# Altium PCB PCB_GEMAS1.1.PcbDoc
Units mm, origin at the board's own origin, x right, y up, seen from the top; angles counter-clockwise.
Board outline 100 x 72 mm, 2 copper layers (Top Layer, Bottom Layer); 89 components, 61 nets, 762 pads, 0 vias.
Unrouted connection lines stored in the file: 223.
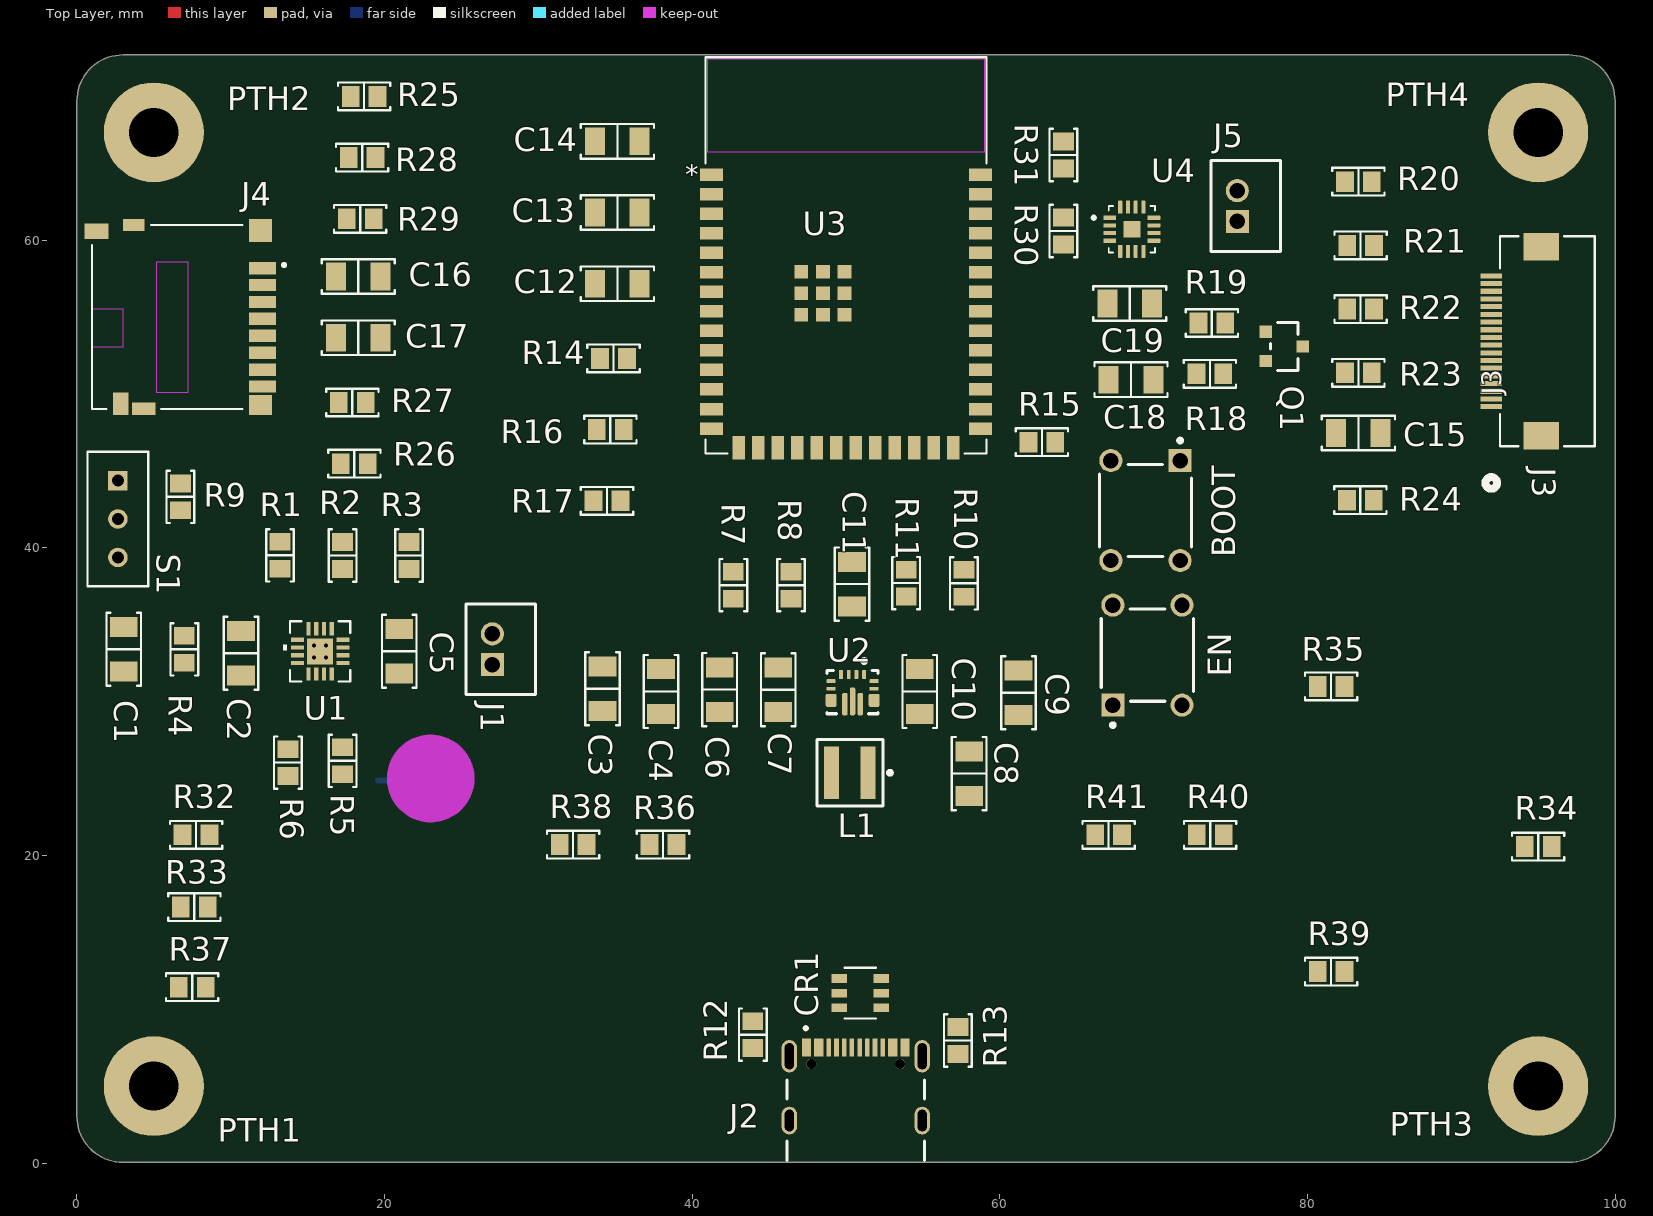
[diagram p0: Top Layer view]
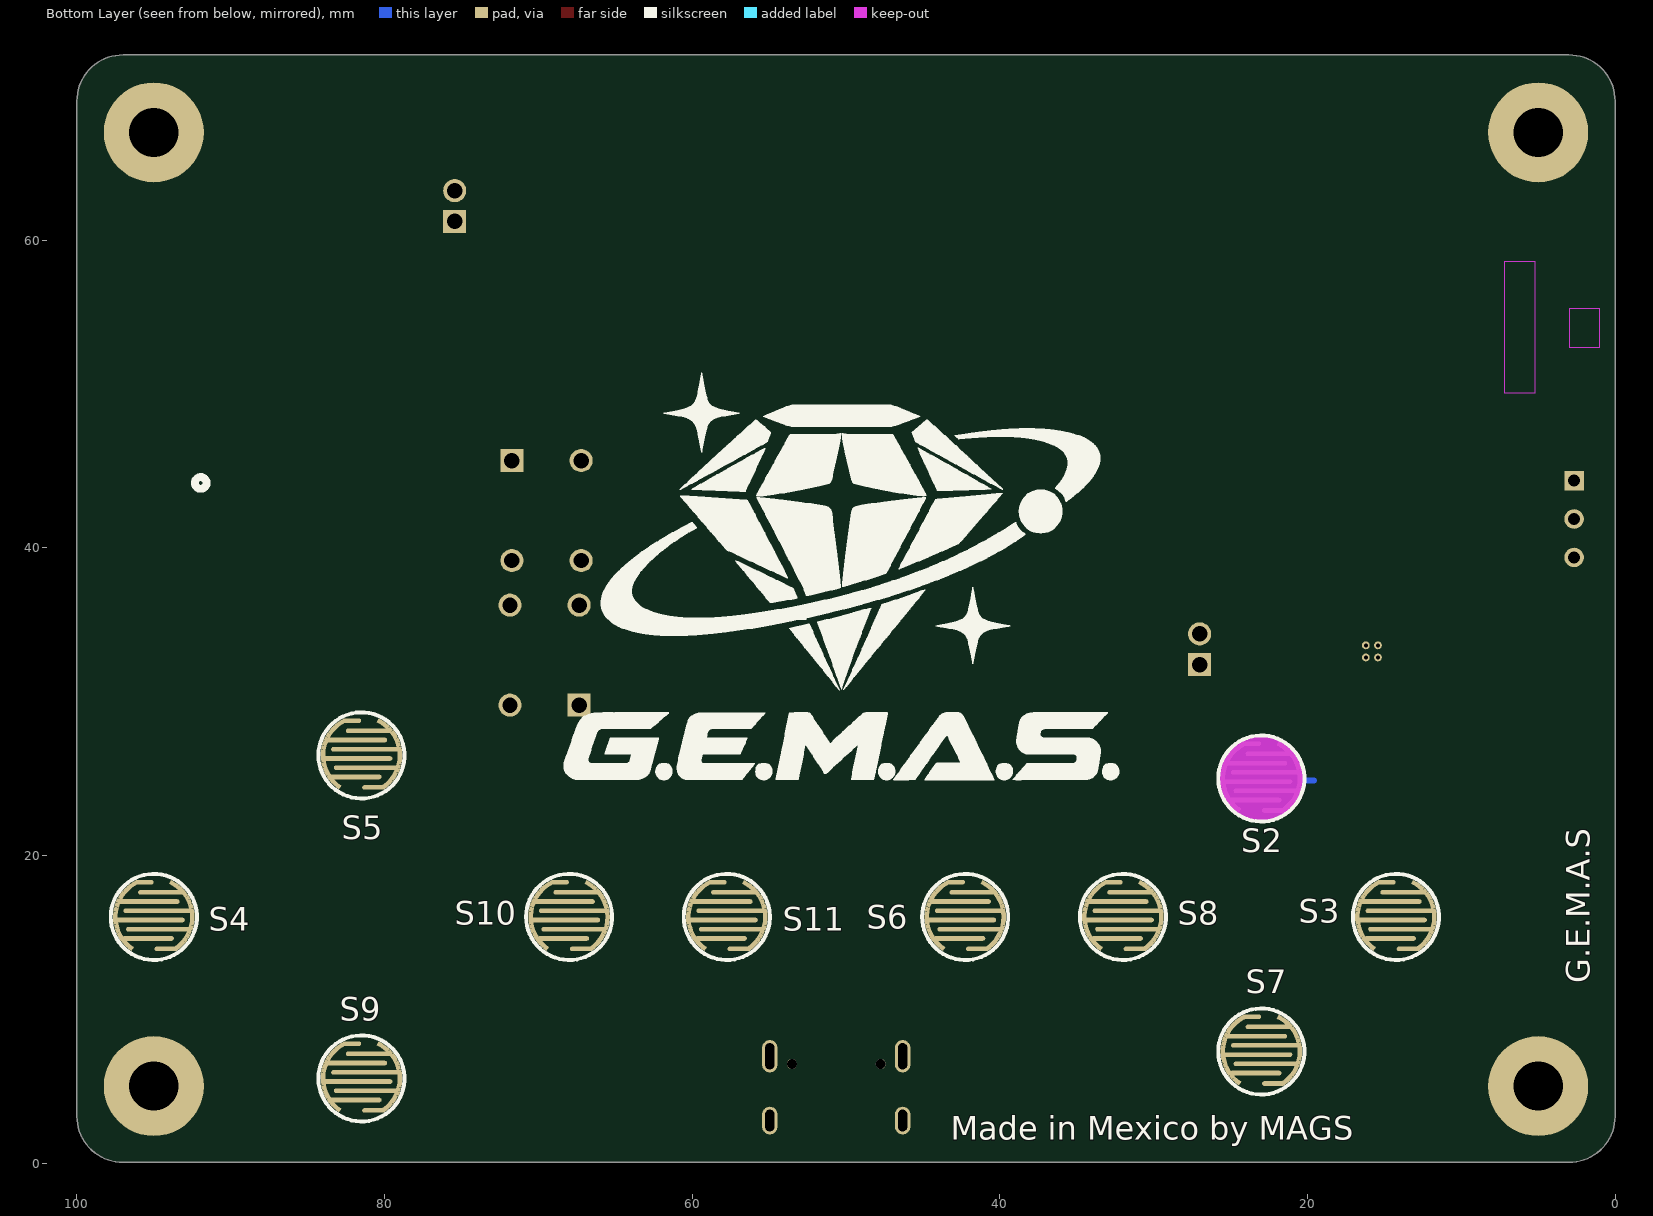
[diagram p1: Bottom Layer view, seen from below]

## Layer stack, top to bottom
Top Solder: solder mask 0.0102, Solder Resist, Dk 3.5
Top Layer: signal copper 0.0356
Dielectric 1: dielectric 0.32, FR-4, Dk 4.8
Bottom Layer: signal copper 0.0356
Bottom Solder: solder mask 0.0102, Solder Resist, Dk 3.5

## Board outline
0,3.041 0,69.041 cw(c3,69.041) 3,72.041 97,72.041 cw(c97,69.041) 100,69.041 100,3.041 cw(c97,3.041) 97,0.041 3,0.041 cw(c3,3.041)

## Design rules (kind name [scope] priority, off if disabled: settings)
Clearance [All] p1: gap=0.4 ignorepadtopadclearanceinfootprint=FALSE
MinimumSolderMaskSliver [All] p1: minsoldermaskwidth=0.1
PolygonConnect [All] p1: connectstyle=Relief reliefconductorwidth=0.254 reliefentries=4 polygonreliefangle="90 Angle" airgapwidth=0.254
RoutingVias [All] p1: holewidth=0.3 width=0.6 viastyle="Through Hole" minholewidth=0.3 minwidth=0.6 maxholewidth=0.3 maxwidth=0.6
SilkToSolderMaskClearance [IsPad] p1: minsilkscreentomaskgap=0.15 clearancetoexposedcopper=TRUE
SolderMaskExpansion [All] p1: expansion=0.05 istentingtop=FALSE
SupplyNets "Schematic Supply Nets_4" [InNet('+3V3')] p1: voltage=0.000
SupplyNets "Schematic Supply Nets_3" [InNet('GND')] p2: voltage=0.000
SupplyNets "Schematic Supply Nets_2" [InNet('VBAT')] p3: voltage=0.000
SupplyNets "Schematic Supply Nets_1" [InNet('VSYS')] p4: voltage=0.000
SupplyNets "Schematic Supply Nets" [InNet('VBUS_V5')] p5: voltage=0.000
Width W_BACKLIGHT [InNetClass('BACKLIGHT')] p1: maxlimit=0.5 minlimit=0.4 preferedwidth=0.5
Width W_SPEAKER [InNetClass('SPEAKER')] p2: maxlimit=0.8 minlimit=0.4 preferedwidth=0.5
Width W_POWER [InNetClass('POWER') Or InNetClass('REG_SW')] p3: maxlimit=1.5 minlimit=0.4 preferedwidth=0.8
Width [All] p4: maxlimit=1.5 minlimit=0.4 preferedwidth=0.5
28 further rules are at their usual default settings.

## Classes and differential pairs
net class GROUND: GND
net class CONTROL: NetR2_2 NetR3_2 NetR9_2 USB_POWER_GOOD_N
net class BUTTONS: NetR32_1 NetR33_1 NetR34_1 NetR35_1 NetR36_1 NetR37_1 NetR38_1 NetR39_1 NetR40_1 NetR41_1
net class AUDIO: NetR30_1 NetR30_2 NetU3_31 NetU3_32 NetU3_33
net class SPI_DISPLAY: NetJ3_2 NetJ3_4 NetJ3_5 NetJ4_2 NetR19_1 SPI_MISO SPI_MOSI SPI_SCK
net class USB: NetCR1_1 NetCR1_3 NetCR1_4 NetCR1_6 NetR16_1 NetR17_1
net class POWER: +3V3 VBAT VBUS_V5 VSYS
component class USB-C: CR1 J2 R12 R13
component class Pantalla_microSD: C15 C16 C17 J3 J4 Q1 R18 R19 R20 R21 R22 R23 R24 R25 R26 R27 R28 R29
component class ESP32: BOOT C12 C13 C14 EN R14 R15 R16 R17 U3
component class Controles: PTH1 PTH2 PTH3 PTH4 R32 R33 R34 R35 R36 R37 R38 R39 R40 R41 S2 S3 S4 S5 S6 S7 S8 S9 S10 S11
component class Audio: C18 C19 J5 R30 R31 U4
component class Alimentacion: C1 C2 C3 C4 C5 C6 C7 C8 C9 C10 C11 J1 L1 R1 R2 R3 R4 R5 R6 R7 R8 R9 R10 R11 S1 U1 U2

## Components (designator, comment, footprint, x,y, rotation, side; value= is the part's Value field where it differs from the comment)
BOOT "B3F-1000" OMRON-B3F-1000-4_V 69.469,42.418 r270 top (schematic designator SW1)
C1 "Capacitor" "CAP 1206_3216" 3.048,33.401 r90 top value=1uF
C2 "Capacitor" "CAP 1206_3216" 10.668,33.147 r270 top value=10uF
C3 "22uF" "CAP 1206_3216" 34.168,30.832 r90 top
C4 "22uF" "CAP 1206_3216" 37.977,30.652 r90 top
C5 "Capacitor" "CAP 1206_3216" 20.955,33.274 r270 top value=10uF
C6 "22uF" "CAP 1206_3216" 41.786,30.779 r90 top
C7 "Capacitor" "CAP 1206_3216" 45.595,30.762 r90 top value=10uF
C8 "Capacitor" "CAP 1206_3216" 58.007,25.318 r90 top value=10uF
C9 "Capacitor" "CAP 1206_3216" 61.219,30.578 r270 top value=10uF
C10 "Capacitor" "CAP 1206_3216" 54.794,30.652 r270 top value=10uF
C11 "Capacitor" "CAP 1206_3216" 50.395,37.638 r270 top value=100nF
C12 "1 uF" "CAP 1206_3216" 35.141,57.164 r0 top
C13 "Capacitor" "CAP 1206_3216" 35.141,61.792 r0 top value=22uF
C14 "Capacitor" "CAP 1206_3216" 35.141,66.421 r180 top value=100nF
C15 "Capacitor" "CAP 1206_3216" 83.312,47.459 r0 top value=100nF
C16 "Capacitor" "CAP 1206_3216" 18.288,57.629 r180 top value=100nF
C17 "Capacitor" "CAP 1206_3216" 18.288,53.65 r180 top value=10uF
C18 "Capacitor" "CAP 1206_3216" 68.527,50.927 r0 top value=10uF
C19 "Capacitor" "CAP 1206_3216" 68.453,55.88 r0 top value=100nF
CR1 "USBLC6-2SC6" SOT23-6L_STM 50.927,11.049 r180 top
EN "B3F-1000" OMRON-B3F-1000-4_V 69.596,33.02 r90 top (schematic designator SW2)
J1 "B2B-PH-K-S(LF)(SN)" JST-B2B-PH-K-S_V 27.559,33.401 r90 top
J2 "USB4105-GF-A" GCT_USB4105-GF-A 50.635,2.762 r0 top
J3 "FH12-18S-0.5SH(55)" CONN_FH12-18S-0.5SH-55_HIR 91.948,49.173 r90 top
J4 "DM3D-SF" HRS_DM3D-SF 12.07,54.979 r90 top
J5 "B2B-PH-K-S(LF)(SN)" JST-B2B-PH-K-S_V 75.988,62.214 r90 top
L1 "1.5uH" FP-XFL4020-MFG 50.255,25.371 r180 top
PTH1 "MH_M3" PCBComponent_1#1 -53.217,211.535 r0 top
PTH2 "MH_M3" PCBComponent_1#2 54.61,212.344 r0 top
PTH3 "MH_M3" PCBComponent_1#3 46.736,212.344 r0 top
PTH4 "MH_M3" PCBComponent_1#4 28.571,279.48 r0 top
Q1 "AO3400A" FP-SOT23-MFG 78.486,53.086 r0 top
R1 "Resistor" "RES 0805_2012" 13.208,39.511 r270 top value="10 k"
R2 "Resistor" "RES 0805_2012" 17.272,39.497 r270 top value="10 k"
R3 "Resistor" "RES 0805_2012" 21.59,39.497 r270 top value="10 k"
R4 "Resistor" "RES 0805_2012" 6.985,33.401 r90 top value="3.48 k"
R5 "Resistor" "RES 0805_2012" 17.272,26.148 r270 top value="10 k"
R6 "Resistor" "RES 0805_2012" 13.716,26.035 r270 top value="1.78 k"
R7 "Resistor" "RES 0805_2012" 42.677,37.563 r270 top value="470 k"
R8 "Resistor" "RES 0805_2012" 46.423,37.563 r90 top value="150 k"
R9 "Resistor" "RES 0805_2012" 6.731,43.307 r90 top value=10k
R10 "Resistor" "RES 0805_2012" 57.663,37.69 r270 top value=10k
R11 "Resistor" "RES 0805_2012" 53.917,37.704 r270 top value=10k
R12 "Resistor" "RES 0805_2012" 43.942,8.349 r90 top value="5.1 k"
R13 "Resistor" "RES 0805_2012" 57.277,7.968 r270 top value="5.1 k"
R14 "10 k" "RES 0805_2012" 34.887,52.31 r0 top value="10 K"
R15 "10 k" "RES 0805_2012" 62.738,46.863 r0 top value="10 K"
R16 "Resistor" "RES 0805_2012" 34.677,47.682 r180 top value=22
R17 "Resistor" "RES 0805_2012" 34.466,43.053 r180 top value=22
R18 "Resistor" "RES 0805_2012" 73.66,51.308 r0 top value="100 k"
R19 "Resistor" "RES 0805_2012" 73.787,54.61 r0 top value=100
R20 "Resistor" "RES 0805_2012" 83.312,63.795 r180 top value="1 k"
R21 "Resistor" "RES 0805_2012" 83.453,59.655 r180 top value="1 k"
R22 "Resistor" "RES 0805_2012" 83.453,55.514 r180 top value="1 k"
R23 "Resistor" "RES 0805_2012" 83.312,51.374 r180 top value="1 k"
R24 "Resistor" "RES 0805_2012" 83.439,43.094 r180 top value="10 k"
R25 "Resistor" "RES 0805_2012" 18.669,69.342 r180 top value="10 k"
R26 "Resistor" "RES 0805_2012" 18.034,45.466 r180 top value="10 k"
R27 "Resistor" "RES 0805_2012" 17.907,49.445 r0 top value="10 k"
R28 "Resistor" "RES 0805_2012" 18.542,65.363 r180 top value="10 k"
R29 "Resistor" "RES 0805_2012" 18.415,61.383 r0 top value="10 k"
R30 "Resistor" "RES 0805_2012" 64.135,60.593 r90 top value="634 K"
R31 "Resistor" "RES 0805_2012" 64.135,65.532 r90 top value=10k
R32 "Resistor" "RES 0805_2012" 7.747,21.336 r180 top value="10 k"
R33 "Resistor" "RES 0805_2012" 7.634,16.637 r180 top value="10 k"
R34 "Resistor" "RES 0805_2012" 94.996,20.574 r0 top value="10 k"
R35 "Resistor" "RES 0805_2012" 81.534,30.988 r0 top value="10 k"
R36 "Resistor" "RES 0805_2012" 38.1,20.701 r180 top value="10 k"
R37 "Resistor" "RES 0805_2012" 7.493,11.43 r180 top value="10 k"
R38 "Resistor" "RES 0805_2012" 32.258,20.701 r0 top value="10 k"
R39 "Resistor" "RES 0805_2012" 81.534,12.446 r180 top value="10 k"
R40 "Resistor" "RES 0805_2012" 73.674,21.336 r0 top value="10 k"
R41 "Resistor" "RES 0805_2012" 67.07,21.336 r180 top value="10 k"
S1 "Single-Pole, Double-Throw Switch" 1P2T_SS-12D00_CNK 2.667,44.37 r0 top
S2 "Single-Pole, Single-Throw Switch" SNES_BTN_soft+mech_5mm_0.3_0.3 23,25 r180 bottom
S3 "Single-Pole, Single-Throw Switch" SNES_BTN_soft+mech_5mm_0.3_0.3 14.25,16 r180 bottom
S4 "Single-Pole, Single-Throw Switch" SNES_BTN_soft+mech_5mm_0.3_0.3 95,16 r180 bottom
S5 "Single-Pole, Single-Throw Switch" SNES_BTN_soft+mech_5mm_0.3_0.3 81.5,26.5 r180 bottom
S6 "Single-Pole, Single-Throw Switch" SNES_BTN_soft+mech_5mm_0.3_0.3 42.25,16 r180 bottom
S7 "Single-Pole, Single-Throw Switch" SNES_BTN_soft+mech_5mm_0.3_0.3 23,7.25 r180 bottom
S8 "Single-Pole, Single-Throw Switch" SNES_BTN_soft+mech_5mm_0.3_0.3 32,16 r180 bottom
S9 "Single-Pole, Single-Throw Switch" SNES_BTN_soft+mech_5mm_0.3_0.3 81.5,5.5 r180 bottom
S10 "Single-Pole, Single-Throw Switch" SNES_BTN_soft+mech_5mm_0.3_0.3 68,16 r180 bottom
S11 "Single-Pole, Single-Throw Switch" SNES_BTN_soft+mech_5mm_0.3_0.3 57.75,16 r180 bottom
U1 "BQ24074RGTR" RGT16_1P7X1P7 15.812,33.261 r180 top
U2 "TPS63070RNMR" FP-RNM0015A-MFG 50.427,30.607 r270 top
U3 "ESP32-S3-WROOM-1-N16R8" ESP32-S3-WROOM-1_EXP 50,59 r0 top
U4 "MAX98357AETE+T" QFN50P300X300X80-17N 68.58,60.706 r0 top

## Footprints (in the part's own frame and the unit in brackets; to place one, negate y for a bottom-side part, rotate by r counter-clockwise, add the part's x,y. Pads: shape width x height; smd on the part's side, far side on the other; paste and mask are expansions set on the pad)
1P2T_SS-12D00_CNK [mil]
  rect 50x50 hole 30 paste-99999 mask+0: 1(0,0)
  round 50 hole 30 paste-99999 mask+0: 2(0,-98.42) 3(0,-196.85)
  silkscreen extent -78,-271 78,74
"CAP 1206_3216" [mm] "Chip Capacitor, 2-Leads, Body 3.25x1.60mm, IPC Medium Density"
  rect 1.3x1.8 smd: 1(-1.45,0) 2(1.45,0)
  silkscreen extent -2.38,-1.13 2.38,1.13, body extent -1.6,-0.81 1.6,0.81, height 1.62
CONN_FH12-18S-0.5SH-55_HIR [mil]
  rect 13x55 smd paste+0 mask+0: 1(0,0) 2(19.68,0) 3(39.37,0) 4(59.05,0) 5(78.74,0) 6(98.42,0) 7(118.11,0) 8(137.79,0) 9(157.48,0) 10(177.17,0) 11(196.85,0) 12(216.54,0) 13(236.22,0) 14(255.91,0) 15(275.59,0) 16(295.28,0) 17(314.96,0) 18(334.65,0)
  rect 71x91 smd paste+0 mask+0: 19(-74.8,-127.95) 20(409.45,-127.95)
  silkscreen extent -210,-264 436,15
ESP32-S3-WROOM-1_EXP [mil]
  rect 59x32 smd paste+0 mask+0: 1(-344.49,207.09) 2(-344.49,157.09) 3(-344.49,107.09) 4(-344.49,57.09) 5(-344.49,7.09) 6(-344.49,-42.91) 7(-344.49,-92.91) 8(-344.49,-142.91) 9(-344.49,-192.91) 10(-344.49,-242.91) 11(-344.49,-292.91) 12(-344.49,-342.91) 13(-344.49,-392.91) 14(-344.49,-442.91) 27(344.49,-442.91) 28(344.49,-392.91) 29(344.49,-342.91) 30(344.49,-292.91) 31(344.49,-242.91) 32(344.49,-192.91) 33(344.49,-142.91) 34(344.49,-92.91) 35(344.49,-42.91) 36(344.49,7.09) 37(344.49,57.09) 38(344.49,107.09) 39(344.49,157.09) 40(344.49,207.09)
  rect 32x59 smd paste+0 mask+0: 15(-275,-492.13) 16(-225,-492.13) 17(-175,-492.13) 18(-125,-492.13) 19(-75,-492.13) 20(-25,-492.13) 21(25,-492.13) 22(75,-492.13) 23(125,-492.13) 24(175,-492.13) 25(225,-492.13) 26(275,-492.13)
  rect 35x35 smd paste+0 mask+0: 41(-59.06,-96.85) 42(-114.17,-41.73) 43(-114.17,-96.85) 44(-114.17,-151.97) 45(-59.06,-151.97) 46(-3.94,-151.97) 47(-3.94,-96.85) 48(-3.94,-41.73) 49(-59.06,-41.73)
  Top Layer keep-out region: 354.5,502 -354.5,502 -354.5,266 354.5,266
  silkscreen extent -359,-507 360,507
FP-RNM0015A-MFG [mm]
  rrect40% 0.6x0.25 smd paste+0 mask-1000: 1(-1.15,0.75) 2(-1.15,0.25) 3(-1.15,-0.25) 4(-1.15,-0.75)
  rrect40% 0.25x0.6 smd paste+0 mask-1000: 5(-0.725,-1.4) 6(-0.225,-1.4) 14(-0.225,1.4) 15(-0.725,1.4)
  rrect29% 0.85x0.7 smd paste-1000 mask-1000: 7-8(0.525,-1.4) 12-13(0.525,1.4)
  rrect57% 1.45x0.35 smd paste-1000 mask-1000: 9(0.775,-0.5) 11(0.775,0.5)
  rrect57% 1.8x0.35 smd paste-1000 mask-1000: 10(0.6,0)
  silkscreen extent -2.15,-1.65 1.4,1.65, body extent -1.25,-1.5 1.25,1.5, height 1
FP-SOT23-MFG [mm]
  rect 0.8x0.8 smd paste+0 mask+0: 1(-1.2,0.95) 2(-1.2,-0.95) 3(1.2,0)
  silkscreen extent -0.9,-1.55 0.9,1.55, body extent -1.41,-1.45 1.41,1.45, height 1.25
FP-XFL4020-MFG [mm]
  rect 0.98x3.4 smd paste+0 mask+0: 1(-1.185,0) 2(1.185,0)
  silkscreen extent -2.73,-2.15 2.15,2.15, body extent -2,-2 2,2, height 2.23
GCT_USB4105-GF-A [mm]
  rect 0.6x1.15 smd mask+0.05: A1_B12(-3.2,4.755) A4_B9(-2.4,4.755) B1_A12(3.2,4.755) B4_A9(2.4,4.755)
  rect 0.3x1.15 smd mask+0.05: A5(-1.25,4.755) A6(-0.25,4.755) A7(0.25,4.755) A8(1.25,4.755) B5(1.75,4.755) B6(0.75,4.755) B7(-0.75,4.755) B8(-1.75,4.755)
  oval 1x2.1 hole 0.6 slot 1.7 at 90 deg: SH1(-4.32,4.18) SH2(4.32,4.18)
  oval 1x1.8 hole 0.6 slot 1.4 at 90 deg: SH3(-4.32,0) SH4(4.32,0)
  round 0.65 hole 0.65 unplated: ""(-2.89,3.68) ""(2.89,3.68)
  silkscreen extent -4.47,-2.6 4.47,6.1
HRS_DM3D-SF [mm]
  rect 0.8x1.75 smd: 1(3.2,0) 2(2.1,0) 3(1,0) 4(-0.1,0) 5(-1.2,0) 6(-2.3,0) 7(-3.4,0) 8(-4.5,0)
  rect 1.3x1.5 smd: S1(-5.7,0.125)
  rect 1.5x1.5 smd: S2(5.65,0.125)
  rect 0.8x1.5 smd: S3(-5.95,7.725)
  rect 0.8x1.4 smd: S4(6,8.375)
  rect 1x1.55 smd: SW-A(5.6,10.8)
  rect 1.45x1 smd: SW-B(-5.625,9.225)
  Keep-Out Layer region: 0.55,9.075 -1.95,9.075 -1.95,11.075 0.55,11.075
  Keep-Out Layer region: 3.6,4.875 -4.9,4.875 -4.9,6.875 3.6,6.875
  Keep-Out Layer region: 3.6,4.875 -4.9,4.875 -4.9,6.875 3.6,6.875
  Keep-Out Layer region: 0.55,9.075 -1.95,9.075 -1.95,11.075 0.55,11.075
  silkscreen extent -5.95,-1.5 6,11.08
JST-B2B-PH-K-S_V [mm] "Connector, 2-Leads, Body 5.9x4.5mm, Pitch 2mm"
  rect 1.5x1.5 hole 1: 1(-1,0.55)
  round 1.5 hole 1: 2(1,0.55)
  silkscreen extent -2.95,-2.25 2.95,2.25, body extent -2.95,-2.25 2.95,2.25, height 6
OMRON-B3F-1000-4_V [mm] "TH, 4-Leads, Body 6x6mm"
  rect 1.5x1.5 hole 1 paste-2539.97: 1(-3.25,2.25)
  round 1.5 hole 1 paste-2539.97: 2(3.25,2.25) 4(3.25,-2.25)
  round 1.5 hole 1 paste-2539.97 mask+0.102: 3(-3.25,-2.25)
  silkscreen extent -4.67,-3 3,3, body extent -3,-3 3,3, height 4.5
PCBComponent_1#1 [mm]
  round 6.5 hole 3.2: 1(58.217,-206.535)
PCBComponent_1#2 [mm]
  round 6.5 hole 3.2: 1(-49.61,-145.344)
PCBComponent_1#3 [mm]
  round 6.5 hole 3.2: 1(48.264,-207.344)
PCBComponent_1#4 [mm]
  round 6.5 hole 3.2: 1(66.429,-212.48)
QFN50P300X300X80-17N [mm]
  rrect25% 0.84x0.27 smd: 1(-1.435,0.75) 2(-1.435,0.25) 3(-1.435,-0.25) 4(-1.435,-0.75) 9(1.435,-0.75) 10(1.435,-0.25) 11(1.435,0.25) 12(1.435,0.75)
  rrect25% 0.27x0.84 smd: 5(-0.75,-1.435) 6(-0.25,-1.435) 7(0.25,-1.435) 8(0.75,-1.435) 13(0.75,1.435) 14(0.25,1.435) 15(-0.25,1.435) 16(-0.75,1.435)
  rect 1.1x1.1 smd paste-0.2: 17(0,0)
  silkscreen extent -2.57,-1.5 1.5,1.5, body extent -1.5,-1.5 1.5,1.5, height 0.9
"RES 0805_2012" [mm] "Chip Resistor, 2-Leads, Body 2.00x1.25mm, IPC Medium Density"
  rect 1.15x1.35 smd: 1(-0.875,0) 2(0.875,0)
  silkscreen extent -1.7,-0.9 1.7,0.9, body extent -1,-0.62 1,0.63, height 0.6
RGT16_1P7X1P7 [mm]
  rect 0.85x0.28 smd paste+0 mask+0: 1(-1.475,0.75) 2(-1.475,0.25) 3(-1.475,-0.25) 4(-1.475,-0.75) 9(1.475,-0.75) 10(1.475,-0.25) 11(1.475,0.25) 12(1.475,0.75)
  rect 0.28x0.85 smd paste+0 mask+0: 5(-0.75,-1.475) 6(-0.25,-1.475) 7(0.25,-1.475) 8(0.75,-1.475) 13(0.75,1.475) 14(0.25,1.475) 15(-0.25,1.475) 16(-0.75,1.475)
  rect 1.7x1.7 smd paste-0.85 mask-0.838: 17(0,0)
  round 0.508 hole 0.254 paste-2539.97 mask-0.254: V(-0.394,0.394) V(-0.394,-0.394) V(0.394,0.394) V(0.394,-0.394)
  silkscreen extent -1.96,-1.96 2.41,1.96, body extent -1.63,-1.63 1.63,1.63, height 1
SNES_BTN_soft+mech_5mm_0.3_0.3 [mm]
  rect 0.3x0.3 smd rot 1.24: 1(-2.499,-0.054)
  rect 0.3x0.3 smd rot 174.75: 1(-2.49,0.229)
  rect 0.3x0.3 smd rot 7.73: 1(-2.477,-0.336)
  rect 0.3x0.3 smd rot 168.27: 1(-2.448,0.508)
  rect 0.3x0.3 smd rot 14.21: 1(-2.423,-0.614)
  rect 0.3x0.3 smd rot 161.78: 1(-2.375,0.782)
  rect 0.3x0.3 smd rot 20.7: 1(-2.339,-0.884)
  rect 0.3x0.3 smd rot 155.29: 1(-2.271,1.045)
  rect 0.3x0.3 smd rot 27.18: 1(-2.224,-1.142)
  rect 0.3x0.3 smd rot 148.81: 1(-2.139,1.295)
  rect 0.3x0.3 smd rot 33.67: 1(-2.081,-1.386)
  rect 0.3x0.3 smd rot 142.32: 1(-1.979,1.528)
  rect 0.3x0.3 smd rot 40.16: 1(-1.911,-1.612)
  rect 0.3x0.3 smd rot 135.84: 1(-1.793,1.742)
  rect 0.3x0.3 smd rot 46.64: 1(-1.716,-1.818)
  rect 0.3x0.3 smd rot 129.35: 1(-1.585,1.933)
  rect 0.3x0.3 smd rot 53.13: 1(-1.5,-2)
  rect 0.3x0.3 smd rot 122.86: 1(-1.357,2.1)
  rect 0.3x0.3 smd rot 118.36: 1(-1.187,2.2)
  rrect100% 1.187x0.3 smd: 1(-0.61,2.26)
  rrect100% 3.377x0.3 smd: 1(-0.383,-1.4)
  rrect100% 3.968x0.3 smd: 1(-0.307,1)
  rrect100% 4.506x0.3 smd: 1(-0.239,-0.2)
  rrect100% 4.434x0.3 smd: 2(0.251,0.4)
  rrect100% 4.169x0.3 smd: 2(0.284,-0.8)
  rrect100% 2.938x0.3 smd: 2(0.452,1.6)
  rrect100% 1.5x0.3 smd: 2(0.8,-2.08)
  rect 0.3x0.3 smd rot 61.64: 2(1.187,2.2)
  rect 0.3x0.3 smd rot 55.16: 2(1.428,2.052)
  rect 0.3x0.3 smd rot 126.87: 2(1.5,-2)
  rect 0.3x0.3 smd rot 48.67: 2(1.651,1.877)
  rect 0.3x0.3 smd rot 131.38: 2(1.652,-1.876)
  rect 0.3x0.3 smd rot 42.18: 2(1.852,1.679)
  rect 0.3x0.3 smd rot 137.86: 2(1.854,-1.677)
  rect 0.3x0.3 smd rot 35.7: 2(2.03,1.459)
  rect 0.3x0.3 smd rot 144.35: 2(2.031,-1.457)
  rect 0.3x0.3 smd rot 29.21: 2(2.182,1.22)
  rect 0.3x0.3 smd rot 150.83: 2(2.183,-1.218)
  rect 0.3x0.3 smd rot 22.72: 2(2.306,0.966)
  rect 0.3x0.3 smd rot 157.32: 2(2.307,-0.964)
  rect 0.3x0.3 smd rot 16.24: 2(2.4,0.699)
  rect 0.3x0.3 smd rot 163.81: 2(2.401,-0.697)
  rect 0.3x0.3 smd rot 9.75: 2(2.464,0.423)
  rect 0.3x0.3 smd rot 170.29: 2(2.464,-0.422)
  rect 0.3x0.3 smd rot 3.27: 2(2.496,0.142)
  rect 0.3x0.3 smd rot 176.78: 2(2.496,-0.14)
  silkscreen extent -2.8,-2.8 2.8,2.8
SOT23-6L_STM [mil]
  rect 38.5x22 smd paste+0 mask+0: 1(-53.75,37.4) 2(-53.75,0) 3(-53.75,-37.4) 4(53.75,-37.4) 5(53.75,0) 6(53.75,37.4)
  silkscreen extent -40,-65 40,65, body extent -59,-60 59,60, height 57

## Part data
BOOT EN: library part CMP-1677-00002-1, "Tactile Switch, SPST-NO, 0.05 A, 5 to 24 V, -25 to 70 degC, 4-Pin THD, RoHS, Bulk", Capacitance="-45 f", Current Rating="1.5 A", Max Operating Temperature="70 degC", Min Operating Temperature="-40 degC", Package Quantity=1080, Voltage Rating="150 V", ComponentLink1Description="Manufacturer URL", ComponentLink1URL=http://www.omron.com/, ComponentLink2Description=Datasheet, ComponentLink2URL=http://www.omron.com/ecb/products/pdf/en-b3f.pdf, Contact Material=Brass, Contact Plating=Gold, DatasheetVersion=Jan-15, Gender=Female, Height="14.99 mm", Lead Pitch="1.27 mm", Length="18.34 mm", Mount="Through Hole", PackageDescription="4-Pin Through Hole Device, Body 6 x 6 mm", PackageReference=B3F-1000, Packaging=Tray, Pins=8, Radiation Hardening=No, RoHSCompliant=true, Shielding=Shielded, Width="25.4 mm"
C3 C4 C6: library part Capacitor, "22F", SimulationGenericComponent=True
C12: library part Capacitor, "Capacitor", SimulationGenericComponent=True
CR1: "ESD Protection for USB 2.0 High Speed", Manufacturer_Name=STMicroelectronics, Copyright="Copyright (C) 2025 Ultra Librarian. All rights reserved.", Manufacturer_Part_Number=USBLC6-2SC6, RefDes=RefDes, Type=Type
J1 J5: library part CMP-2000-05162-1, "Male Header, Pitch 2 mm, 1 x 2 Position, Height 6 mm, Tail Length 3.4 mm, -25 to 85 degC, RoHS, Bulk", Manufacturer=JST, Datasheet URL=http://datasheet.octopart.com/B2B-PH-K-S%28LF%29%28SN%29-JST-datasheet-8324864.pdf, Datasheet Version=Nov-08, Manufacturer URL=http://www.jst.com/home2.html, No of Positions=2, Pitch=2mm, Style/Orientation=StraightHeader/Plug, Termination=Crimp, Type=ShroudedHeader
J2: Package=None, Availability=Unavailable, MF="{'manufacturer': u'GCT'}", MP=USB4105-GF-A, Price=None
J3: library part FH12-18S-0.5SH55, "Description", Manufacturer_Name=Hirose, Copyright="Copyright (C) 2026 Ultra Librarian. All rights reserved.", Manufacturer_Part_Number=FH12-18S-0.5SH(55), RefDes=RefDes, Type=Type
J4: "10 _8 + 2_ Position Card Connector Secure Digital - microSDâ„¢ Surface Mount, Right Angle Gold", Package=None, Availability=Unavailable, MF="Hirose Electric", MP=DM3D-SF, Price=None, SnapEDA_Link=https://www.snapeda.com/parts/DM3D-SF/Hirose%20Electric%20Co%20Ltd/view-part/250106/?ref=snap
L1: library part CMP-11268-000104-1, "Inductor Power Shielded Wirewound 1.5uH 20% 100KHz 9.1A 15.8mOhm DCR 1515 Automotive Embossed Plastic T/R", Case/Package=SMD/SMT, DC Resistance (DCR)=15.8mR, Inductance Tolerance=20%, Max DC Current=9.1A, Max Operating Temperature=125°C, Min Operating Temperature=-40°C, Saturation Current=4.1A, Self Resonant Frequency=59MHz, Test Frequency=100kHz, Core Material=Composite, Height=2.1mm, Inductance=1.5uH, Lead Free="Contains Lead", Length=4.3mm, Mount="Surface Mount", Packaging="Tape and Reel", REACH SVHC="No SVHC", RMS Current (Irms)=9.1A, RoHS Compliant=Yes, Series=XFL4020, Shielding=Shielded, Termination=SMD/SMT, Tolerance=20%, Width=4.3mm
Q1: library part CMP-83955-000006-1, "MOSFET N-CH 30V 5.7A SOT23", Case/Package=SOT-23, Continuous Drain Current (ID)=5.7A, Drain to Source Voltage (Vdss)=30V, Gate to Source Voltage (Vgs)=12V, Input Capacitance=630pF, Max Operating Temperature=150°C, Max Power Dissipation=1.4W, Min Operating Temperature=-55°C, Lead Free="Lead Free", Mount="Surface Mount", Number of Elements=1, Number of Pins=3, Packaging="Tape and Reel", Power Dissipation=1.4W, Radiation Hardening=No, Rds On Max=26.5mR
R14 R15: library part Resistor, "Resistor", SimulationGenericComponent=True, TC1=0, TC2=0
S1: library part "SPDT SW", nodeUP_closed=1, Rclosed=1m, Ropen=1Meg, SimulationGenericComponent=True
S2 S3 S4 S5 S6 S7 S8 S9 S10 S11: library part "SPST SW", closed=0, Rclosed=1m, Ropen=1Meg, SimulationGenericComponent=True
U1: "Standalone 1-cell 1.5-A linear battery charger, Power Path, 4.2-V VBAT, 10.5-V OVP and 4.4-V VOUT 16-VQFN -40 to 85", Manufacturer_Name="Texas Instruments", Copyright="Copyright (C) 2026 Ultra Librarian. All rights reserved.", Manufacturer_Part_Number=BQ24074RGTR, RefDes=RefDes, Type=Type
U2: library part CMP-04918-000409-1, "IC REG BCK BST ADJ 3.6A 15VQFN", Case/Package=VQFN, Max Input Voltage=16V, Max Operating Temperature=125°C, Max Output Voltage=9V, Min Input Voltage=2V, Min Operating Temperature=-40°C, Min Output Voltage=2.5V, Output Current=2A, Quiescent Current=50uA, Switching Frequency=2.4MHz, Lead Free="Lead Free", Mount="Surface Mount", Number of Outputs=1, Number of Pins=15, Output Configuration=Positive, Output Type=Adjustable, Packaging="Tape and Reel", RoHS Compliant=Yes, Synchronous Rectifier=Yes, Topology=Buck-Boost
U3: "Description", Manufacturer_Name="Espressif Systems", Copyright="Copyright (C) 2026 Ultra Librarian. All rights reserved.", Manufacturer_Part_Number=ESP32-S3-WROOM-1-N16R8, RefDes=RefDes, Type=Type
U4: "Tiny, Low-Cost, PCM Class D Amplifier with Class AB Performance", Package="TQFN-16 Maxim", Check_prices=https://www.snapeda.com/parts/MAX98357AETE+T/Analog+Devices/view-part/?ref=eda, MF="Analog Devices", MP=MAX98357AETE+T, SnapEDA_Link=https://www.snapeda.com/parts/MAX98357AETE+T/Analog+Devices/view-part/?ref=snap
C1 C2 C5 C7 C8 C9 C10 C11 C13 C14 C15 C16 C17 C18 C19: SimulationGenericComponent=True
R1 R2 R3 R4 R5 R6 R7 R8 R9 R10 R11 R12 R13 R16 R17 R18 R19 R20 R21 R22 R23 R24 R25 R26 R27 R28 R29 R30 R31 R32 R33 R34 R35 R36 R37 R38 R39 R40 R41: SimulationGenericComponent=True, TC1=0, TC2=0

## Nets (pads, with @x,y where several pads share a name; then routed paths per layer and width w, separated by ;. In a path a pad name is that pad's centre, name@x,y a point inside that pad or via, vN(x,y) a via of type N, cw(c..) or ccw(c..) an arc to the next point about the centre after c; other vN are vias at no path point)
+3V3: C3.1 C4.1 C6.1 C7.1 C13.2 C14.1 C15.2 C16.2 C17.2 C18.2 C19.2 J3.9 J3.10 J4.4 R1.1 R7.2 R9.1 R14.2 R15.2 R24.2 R25.1 R26.1 R27.2 R28.2 R29.2 R32.2 R33.2 R34.2 R35.2 R36.2 R37.2 R38.2 R39.2 R40.2 R41.2 U2.7-8 U3.2 U4.7 U4.8
GND: BOOT.4 C1.2 C2.1 C3.2 C4.2 C5.1 C6.2 C7.2 C8.1 C9.1 C10.1 C11.1 C12.1 C13.1 C14.2 C15.1 C16.1 C17.1 C18.1 C19.1 CR1.2 EN.3 J1.2 J2.A1_B12 J2.B1_A12 J2.SH1 J2.SH2 J2.SH3 J2.SH4 J3.1 J3.8 J4.6 J4.S1 J4.S2 J4.S3 J4.S4 PTH1.1 PTH2.1 PTH3.1 PTH4.1 Q1.2 R2.1 R3.1 R4.2 R5.2 R6.2 R8.2 R12.1 R13.2 R18.1 R31.2 S1.2 S2.1 S3.1 S4.1 S5.1 S6.1 S7.1 S8.1 S9.1 S10.1 S11.1 U1.4 U1.8 U1.17 U2.4 U2.10 U2.15 U3.1 U3.40 U3.41 U3.42 U3.43 U3.44 U3.45 U3.46 U3.47 U3.48 U3.49 U4.3 U4.11 U4.15 U4.17
NetC11_2: C11.2 U2.3
NetC12_2: C12.2 EN.2 R14.1 U3.3
NetCR1_1: CR1.1 J2.A6 J2.B6
NetCR1_3: CR1.3 J2.A7 J2.B7
NetCR1_4: CR1.4 R16.2
NetCR1_6: CR1.6 R17.2
NetJ2_A5: J2.A5 R12.2
NetJ2_B5: J2.B5 R13.1
NetJ3_2: J3.2 U3.11
NetJ3_4: J3.4 U3.10
NetJ3_5: J3.5 R24.1 U3.18
NetJ3_11: J3.11 R23.1
NetJ3_12: J3.12 R22.1
NetJ3_13: J3.13 R21.1
NetJ3_14: J3.14 R20.1
NetJ4_1: J4.1 R25.2
NetJ4_2: J4.2 R28.1 U3.22
NetJ4_8: J4.8 R26.2
NetJ5_1: J5.1 U4.9
NetJ5_2: J5.2 U4.10
NetL1_1: L1.1 U2.11
NetL1_2: L1.2 U2.9
NetQ1_1: Q1.1 R18.2 R19.2
NetQ1_3: Q1.3 R20.2 R21.2 R22.2 R23.2
NetR2_2: R2.2 U1.6 U3.34
NetR3_2: R3.2 U1.5 U3.25
NetR4_1: R4.1 U1.12
NetR5_1: R5.1 U1.1
NetR6_1: R6.1 U1.16
NetR7_1: R7.1 R8.1 U2.5
NetR9_2: R9.2 S1.1 U3.8
NetR10_2: R10.2 U2.14
NetR11_2: R11.2 U2.1
NetR15_1: BOOT.1 R15.1 U3.27
NetR16_1: R16.1 U3.13
NetR17_1: R17.1 U3.14
NetR19_1: R19.1 U3.23
NetR30_1: R30.1 U4.4
NetR30_2: R30.2 R31.1 U3.36
NetR32_1: R32.1 S2.2 U3.39 | length 0.8
  Bottom Layer w0.4: 19.59,24.86 S2.2@20.354,24.86
NetR33_1: R33.1 S3.2 U3.4
NetR34_1: R34.1 S4.2 U3.6
NetR35_1: R35.1 S5.2 U3.12
NetR36_1: R36.1 S6.2 U3.35
NetR37_1: R37.1 S7.2 U3.38
NetR38_1: R38.1 S8.2 U3.5
NetR39_1: R39.1 S9.2 U3.7
NetR40_1: R40.1 S10.2 U3.17
NetR41_1: R41.1 S11.2 U3.24
NetU3_31: U3.31 U4.16
NetU3_32: U3.32 U4.14
NetU3_33: U3.33 U4.1
SPI_MISO: J3.7 J4.7 R27.1 U3.21
SPI_MOSI: J3.6 J4.3 R29.1 U3.19
SPI_SCK: J3.3 J4.5 U3.20
USB_POWER_GOOD_N: R1.2 U1.7 U3.9
VBAT: C5.2 J1.1 U1.2 U1.3
VBUS_V5: C1.1 CR1.5 J2.A4_B9 J2.B4_A9 U1.13
VSYS: C2.2 C8.2 C9.2 C10.2 R10.1 R11.1 U1.10 U1.11 U2.12-13
pads on no net: BOOT.2 BOOT.3 EN.1 EN.4 J2. J2.A8 J2.B8 J3.15 J3.16 J3.17 J3.18 J3.19 J3.20 J4.SW-A J4.SW-B S1.3 U1.9 U1.14 U1.15 U1.V U2.2 U2.6 U3.15 U3.16 U3.26 U3.28 U3.29 U3.30 U3.37 U4.2 U4.5 U4.6 U4.12 U4.13

## Polygon pours and split planes (outlines as drawn)
GND on Bottom Layer "NONET_L-01_P-001" (solid, pour order 0): -34.29,3.175 -34.163,3.175 -34.036,3.048

## Keep-outs
Top Layer:
  circle w2.85: c23,25 r1.425
Bottom Layer:
  region: 25.751,25.746 ccw(c23,25) 20.227,25.66 21.25,25.66 21.25,24.06 20.31,24.06 ccw(c23,25) 25.719,24.146 24.75,24.146 24.75,25.746
Keep-Out Layer:
  circle w2.85: c23,25 r1.425

## Silkscreen, mask and mechanical layers (free items; w line width, h text height)
Top Overlay:
  lines w0.013: -6391.033,-47.765 ccw(c-5488.255,1916.073) -6391.001,-47.78 ; -42.776,-47.873 cw(c3474.709,-43.472) -42.776,-47.845 ; 4518.294,-47.816 ccw(c5084.386,1183.527) 4518.314,-47.825 ; 4518.393,-47.861 cw(c3944.355,-1296.634) 4518.418,-47.873
Bottom Overlay:
  drawing of 36 lines, arcs and shapes, not listed
  text "G.E.M.A.S" at 1.643,11.686 h1.52 r270
  text "Made in Mexico by MAGS" at 43.18,1.524 h1.52
Mechanical 1:
  lines w0.013: -42.776,-47.873 cw(c3474.709,-43.472) -42.776,-47.845
  lines w0.254: 0,3.041 ccw(c3,3.041) 3,0.041 97,0.041 ccw(c97,3.041) 100,3.041 100,69.041 ccw(c97,69.041) 97,72.041 3,72.041 ccw(c3,69.041) 0,69.041 0,3.041

## Text inside footprints (layer, text, board x,y; h text height)
CR1: Mechanical 13 "*" at 51.74,10.871 h1.27 r180
J2: Mechanical 13 "PCB EDGE" at 56.035,0.262 h0.41
S1: Mechanical 13 "*" at 0.876,43.735 h1.27
U1: Mechanical 13 "*" at 16.925,32.896 h1.27 r180
U3: Top Overlay "*" at 39.548,63.625 h1.27; Mechanical 13 "*" at 42.317,63.625 h1.27